# Altium PCB mla_opamp.PcbDoc (part 3 of 3)
Units mil, origin at the board's own origin, x right, y up, seen from the top; angles counter-clockwise.
Board outline 7165.35 x 3582.68 mil, 4 copper layers (Top Layer, PWD, GND, Bottom Layer), stack 23.756 mil thick; 177 components, 237 nets, 809 pads, 473 vias.
Unrouted connection lines stored in the file: 312.
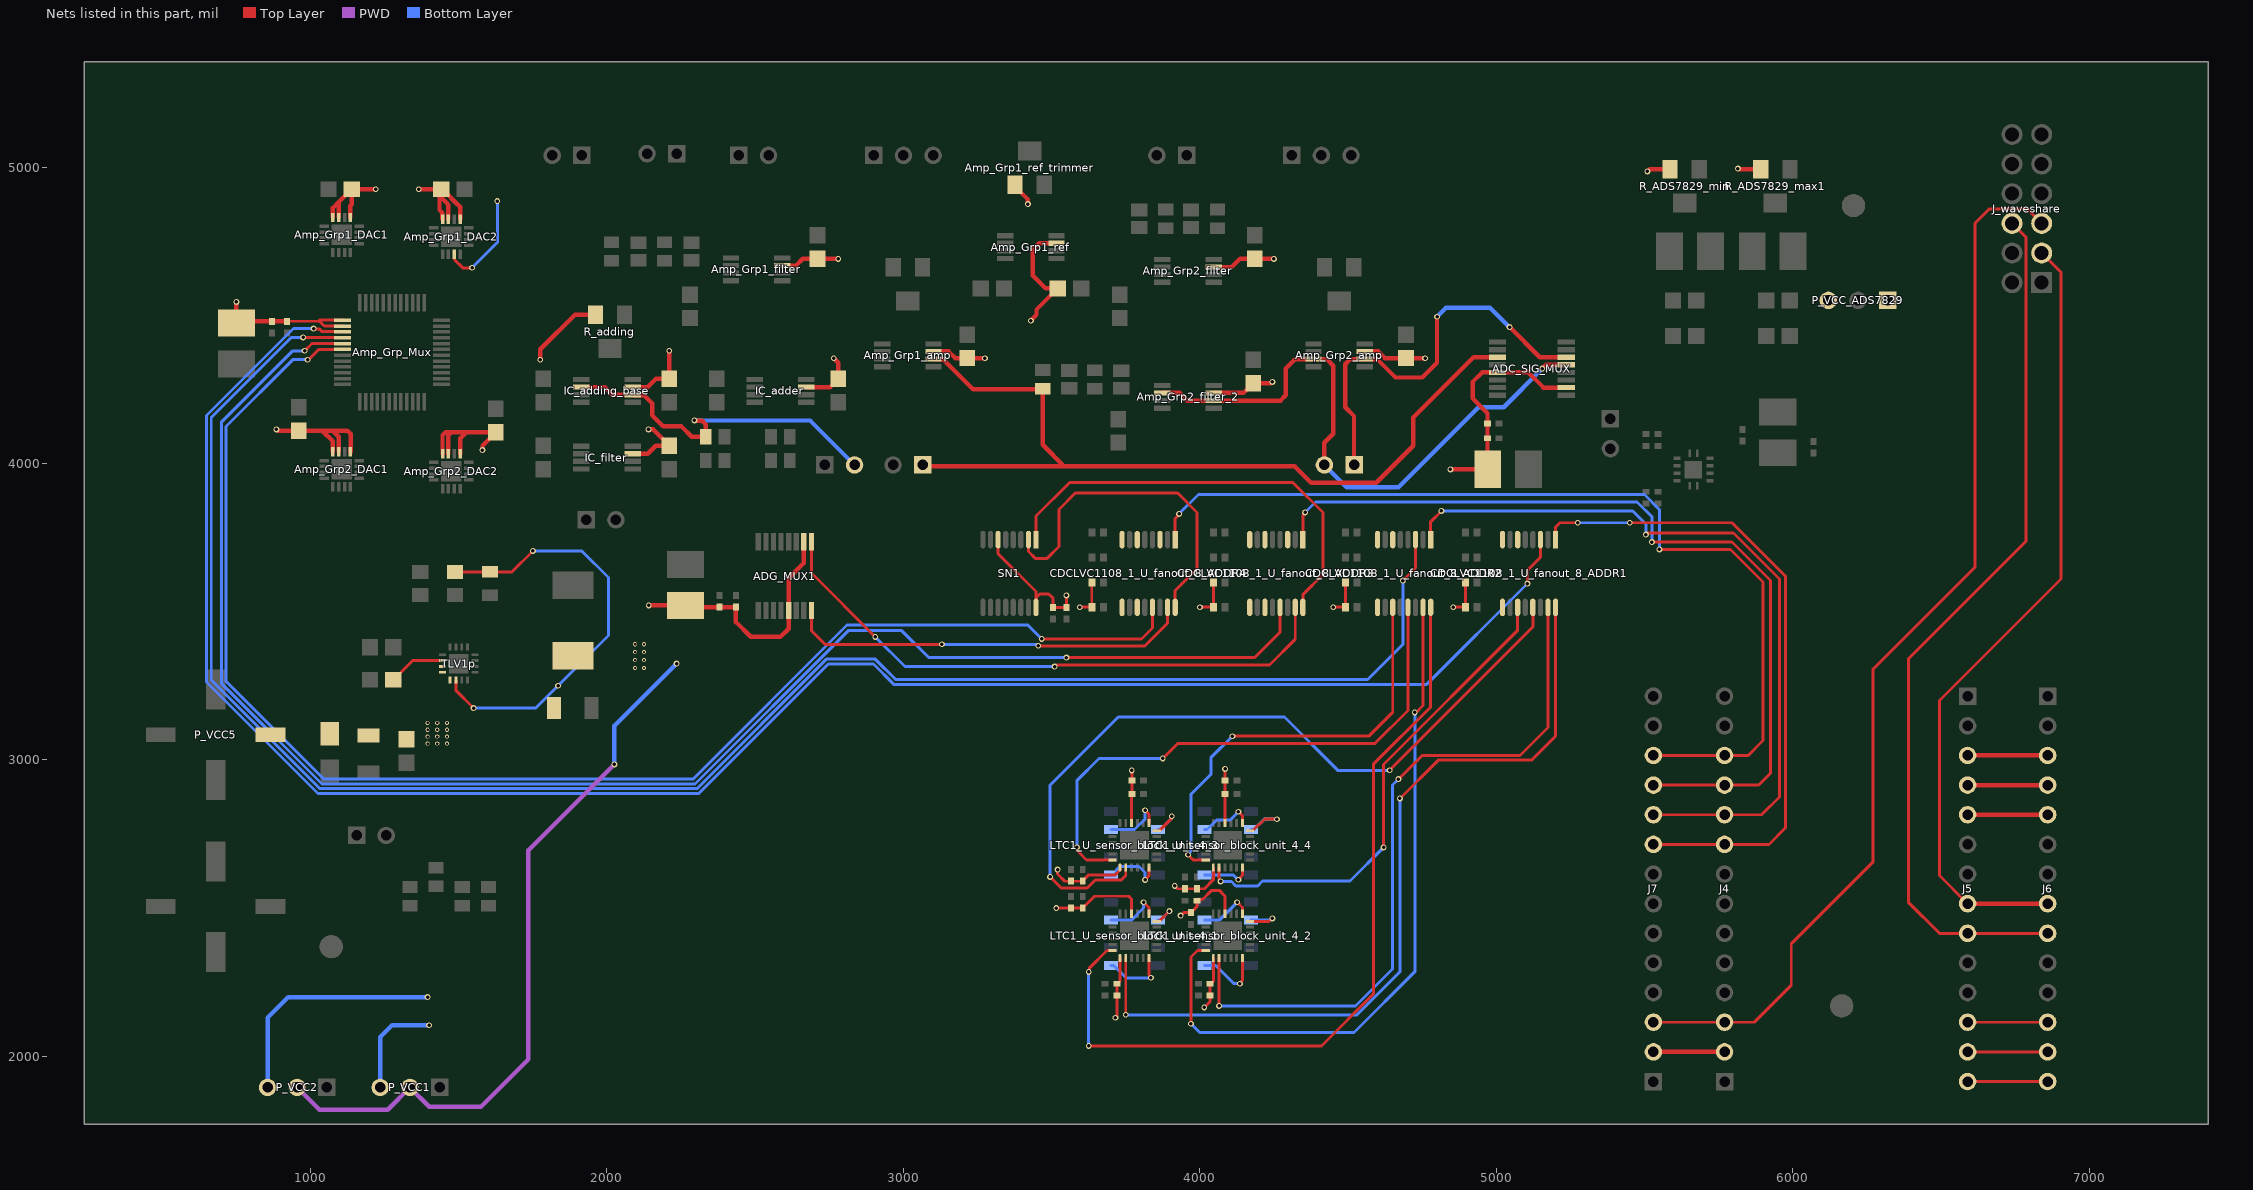
[diagram p5: the nets of this part, all layers, seen from the top]

## Via types
v1: diameter 13.78, hole 7.87, Top Layer to Bottom Layer, 282 vias
v2: diameter 19.68, hole 11.81, Top Layer to Bottom Layer, 187 vias
v3: diameter 20, hole 11, Top Layer to Bottom Layer, 4 vias

## Nets (pads, with @x,y where several pads share a name; then routed paths per layer and width w, separated by ;. In a path a pad name is that pad's centre, name@x,y a point inside that pad or via, vN(x,y) a via of type N, cw(c..) or ccw(c..) an arc to the next point about the centre after c; other vN are vias at no path point) (continued)
pt_2_U_sensor_block_unit_4_1: LTC1_U_sensor_block_unit_4_1.13 photo_transistor_2_U_sensor_block_unit_4_1.1 | length 192.7
  Top Layer w10: v2(3810.21,2520) 3810.21,2519.79 3828.66,2501.34 3828.66,2481.18 LTC1_U_sensor_block_unit_4_1.13@3828.74,2481.1
  Bottom Layer w10: photo_transistor_2_U_sensor_block_unit_4_1.1@3700.79,2459.29 3769.29,2459.29 3810.21,2500.21 v2(3810.21,2520)
pt_2_U_sensor_block_unit_4_2: LTC1_U_sensor_block_unit_4_2.13 photo_transistor_2_U_sensor_block_unit_4_2.1 | length 181.5
  Top Layer w10: v2(4125.71,2520) 4143.62,2502.09 4143.62,2481.18 LTC1_U_sensor_block_unit_4_2.13@4143.7,2481.1
  Bottom Layer w10: photo_transistor_2_U_sensor_block_unit_4_2.1@4015.75,2459.29 4065,2459.29 v2(4125.71,2520)
pt_2_U_sensor_block_unit_4_3: LTC1_U_sensor_block_unit_4_3.13 photo_transistor_2_U_sensor_block_unit_4_3.1 | length 207.9
  Top Layer w10: v2(3815,2830) 3828.74,2816.26 LTC1_U_sensor_block_unit_4_3.13@3828.74,2786.61
  Bottom Layer w10: photo_transistor_2_U_sensor_block_unit_4_3.1@3700.79,2764.8 3779.8,2764.8 3815,2800 v2(3815,2830)
pt_2_U_sensor_block_unit_4_4: LTC1_U_sensor_block_unit_4_4.13 photo_transistor_2_U_sensor_block_unit_4_4.1 | length 183.2
  Top Layer w10: v2(4130,2825) 4143.7,2811.3 LTC1_U_sensor_block_unit_4_4.13@4143.7,2786.61
  Bottom Layer w10: photo_transistor_2_U_sensor_block_unit_4_4.1@4015.75,2764.8 4024.31,2764.8 4056.89,2797.38 4102.38,2797.38 v2(4130,2825)
pt_3_U_sensor_block_unit_4_1: LTC1_U_sensor_block_unit_4_1.12 photo_transistor_3_U_sensor_block_unit_4_1.1 | length 109.5
  Top Layer w10: LTC1_U_sensor_block_unit_4_1.12@3854.33,2455.51 3863.03,2455.51 v2(3897.54,2490)
  Bottom Layer w10: photo_transistor_3_U_sensor_block_unit_4_1.1@3858.27,2459.29 3866.83,2459.29 v2(3897.54,2490)
pt_3_U_sensor_block_unit_4_2: LTC1_U_sensor_block_unit_4_2.12 photo_transistor_3_U_sensor_block_unit_4_2.1 | length 153.8
  Top Layer w10: LTC1_U_sensor_block_unit_4_2.12@4169.29,2455.51 4232.89,2455.51 4242.38,2465 v2(4245,2465)
  Bottom Layer w10: photo_transistor_3_U_sensor_block_unit_4_2.1@4173.23,2459.29 4239.29,2459.29 v2(4245,2465)
pt_3_U_sensor_block_unit_4_3: LTC1_U_sensor_block_unit_4_3.12 photo_transistor_3_U_sensor_block_unit_4_3.1 | length 144.6
  Top Layer w10: LTC1_U_sensor_block_unit_4_3.12@3854.33,2761.02 3863.03,2761.02 3903.15,2801.14 3903.15,2808.15 v2(3905,2810)
  Bottom Layer w10: photo_transistor_3_U_sensor_block_unit_4_3.1@3858.27,2764.8 3866.83,2764.8 3905,2802.97 v2(3905,2810)
pt_3_U_sensor_block_unit_4_4: LTC1_U_sensor_block_unit_4_4.12 photo_transistor_3_U_sensor_block_unit_4_4.1 | length 208.2
  Top Layer w10: LTC1_U_sensor_block_unit_4_4.12@4169.29,2761.02 4177.99,2761.02 4198.9,2781.93 4200,2781.93 4218.07,2800 v2(4260,2800)
  Bottom Layer w10: photo_transistor_3_U_sensor_block_unit_4_4.1@4173.23,2764.8 4181.79,2764.8 4216.99,2800 v2(4260,2800)
pt_4_U_sensor_block_unit_4_1: LTC1_U_sensor_block_unit_4_1.6 photo_transistor_4_U_sensor_block_unit_4_1.1 | length 220.5
  Top Layer w10: LTC1_U_sensor_block_unit_4_1.6@3828.74,2331.5 3828.74,2273.88 3835,2267.62 v2(3835,2265)
  Bottom Layer w10: photo_transistor_4_U_sensor_block_unit_4_1.1@3700.79,2306.54 3709.35,2306.54 3750.89,2265 v2(3835,2265)
pt_4_U_sensor_block_unit_4_2: LTC1_U_sensor_block_unit_4_2.6 photo_transistor_4_U_sensor_block_unit_4_2.1 | length 234.8
  Top Layer w10: v2(4135,2245) 4135,2247.62 4143.7,2256.32 LTC1_U_sensor_block_unit_4_2.6@4143.7,2331.5
  Bottom Layer w10: photo_transistor_4_U_sensor_block_unit_4_2.1@4015.75,2306.54 4053.46,2306.54 4115,2245 v2(4135,2245)
pt_4_U_sensor_block_unit_4_3: LTC1_U_sensor_block_unit_4_3.6 photo_transistor_4_U_sensor_block_unit_4_3.1 | length 211.4
  Top Layer w10: v2(3814.96,2595.19) 3828.74,2608.96 LTC1_U_sensor_block_unit_4_3.6@3828.74,2637.01
  Bottom Layer w10: photo_transistor_4_U_sensor_block_unit_4_3.1@3700.79,2612.05 3709.35,2612.05 3719.31,2622.01 3719.31,2630.57 3728.74,2640 3795,2640 3814.96,2620.04 v2(3814.96,2595.19)
pt_4_U_sensor_block_unit_4_4: LTC1_U_sensor_block_unit_4_4.6 photo_transistor_4_U_sensor_block_unit_4_4.1 | length 167.8
  Top Layer w10: v2(4130,2595.84) 4130,2597.62 4143.62,2611.24 4143.62,2636.93 LTC1_U_sensor_block_unit_4_4.6@4143.7,2637.01
  Bottom Layer w10: photo_transistor_4_U_sensor_block_unit_4_4.1@4015.75,2612.05 4112.95,2612.05 4129.16,2595.84 v2(4130,2595.84)
PT_ADDR_0_CP1: CDCLVC1108_1_U_fanout_8_ADDR1.16 LTC1_U_sensor_block_unit_4_1.2 | length 2808.2
  Top Layer w10: v2(3750,2140) LTC1_U_sensor_block_unit_4_1.2@3750,2331.5 ; v2(4675,2870) 4804,2999 5119,2999 5200,3080 CDCLVC1108_1_U_fanout_8_ADDR1.16@5200,3514.68
  Bottom Layer w10: v2(3750,2140) 4530,2140 4675,2285 v2(4675,2870)
PT_ADDR_0_CP2: CDCLVC1108_1_U_fanout_8_ADDR1.15 LTC1_U_sensor_block_unit_4_2.2 | length 2428.5
  Top Layer w10: v2(4065,2170) LTC1_U_sensor_block_unit_4_2.2@4064.96,2331.5 ; v2(4670,2935) 4750,3015 5080,3015 5174.41,3109.41 CDCLVC1108_1_U_fanout_8_ADDR1.15@5174.41,3514.68
  Bottom Layer w10: v2(4065,2170) 4525,2170 4650,2295 4650,2915 v2(4670,2935)
PT_ADDR_0_CP3: CDCLVC1108_1_U_fanout_8_ADDR1.13 LTC1_U_sensor_block_unit_4_3.2 | length 2689.4
  Top Layer w10: v2(3495,2605) 3532.18,2567.82 3620,2567.82 3647.18,2595 3735,2595 3750,2610 LTC1_U_sensor_block_unit_4_3.2@3750,2637.01 ; v2(4640,2965) 5123.23,3448.23 CDCLVC1108_1_U_fanout_8_ADDR1.13@5123.23,3514.68
  Bottom Layer w10: v2(3495,2605) 3495,2915 3724.84,3144.84 4285.16,3144.84 4465,2965 v2(4640,2965)
PT_ADDR_0_CP4: CDCLVC1108_1_U_fanout_8_ADDR1.11 LTC1_U_sensor_block_unit_4_4.2 | length 1656.8
  Top Layer w10: LTC1_U_sensor_block_unit_4_4.2@4064.96,2637.01 4064.96,2597.66 4070,2592.62 v2(4070,2590) ; v2(4620,2705) 4619.16,2705.84 4619.16,2984.16 5072.05,3437.05 CDCLVC1108_1_U_fanout_8_ADDR1.11@5072.05,3514.68
  Bottom Layer w10: v2(4070,2590) 4106.37,2590 4121.37,2575 4195,2575 4211.46,2591.46 4506.46,2591.46 v2(4620,2705)
PT_ADDR_1: CDCLVC1108_1_U_fanout_8_ADDR1.1 J4.9 J7.9 | length 2215.5
  Top Layer w10: CDCLVC1108_1_U_fanout_8_ADDR1.1@5200,3743.03 5200,3785 5215,3800 v2(5275,3800) ; v2(5450,3800) 5795,3800 5975,3620 5975,2770 5920,2715 J4.9@5770,2715 J7.9@5530,2715
  Bottom Layer w10: v2(5275,3800) v2(5450,3800)
PT_ADDR_1_CP: Amp_Grp_Mux.15 CDCLVC1108_1_U_fanout_8_ADDR1.3 | length 6611.9
  Top Layer w10: v2(1010,4455) 1011.85,4453.15 1030.69,4453.15 1039.39,4444.45 1107.6,4444.45 Amp_Grp_Mux.15@1108.15,4443.9 ; v2(5105,3595) 5105,3640 5148.82,3683.82 CDCLVC1108_1_U_fanout_8_ADDR1.3@5148.82,3743.03
  Bottom Layer w10: v2(1010,4455) 942.37,4455 649,4161.63 649,3263.12 1025.12,2887 2309.88,2887 2746.57,3323.69 2898.69,3323.69 2967.37,3255 4765,3255 v2(5105,3595)
PT_ADDR_1_CP1: CDCLVC1108_1_U_fanout_8_ADDR2.16 LTC1_U_sensor_block_unit_4_1.24 | length 2782.8
  Top Layer w10: v2(3625,2035) 4410,2035 4585,2210 4585,2985 4778.68,3178.68 CDCLVC1108_1_U_fanout_8_ADDR2.16@4778.68,3514.68 ; v2(3625,2285) 3626.85,2286.85 3626.85,2296.85 3687.09,2357.09 LTC1_U_sensor_block_unit_4_1.24@3704.72,2357.09
  Bottom Layer w10: v2(3625,2035) v2(3625,2285)
PT_ADDR_1_CP2: CDCLVC1108_1_U_fanout_8_ADDR2.15 LTC1_U_sensor_block_unit_4_2.24 | length 2379
  Top Layer w10: v2(3970,2110) 3970,2335 3992.09,2357.09 LTC1_U_sensor_block_unit_4_2.24@4019.68,2357.09 ; v2@4727.5,3157.5 4753.09,3183.09 CDCLVC1108_1_U_fanout_8_ADDR2.15@4753.09,3514.68
  Bottom Layer w10: v2(3970,2110) 4000,2080 4520,2080 4725,2285 v2(4725,3160)
PT_ADDR_1_CP3: CDCLVC1108_1_U_fanout_8_ADDR2.13 LTC1_U_sensor_block_unit_4_3.24 | length 1931
  Top Layer w10: v2(3585,2705) 3586.85,2703.15 3586.85,2693.15 3617.32,2662.68 3704.65,2662.68 LTC1_U_sensor_block_unit_4_3.24@3704.72,2662.6 ; v2(3875,3005) 3925,3055 4590,3055 4701.91,3166.91 CDCLVC1108_1_U_fanout_8_ADDR2.13@4701.91,3514.68
  Bottom Layer w10: v2(3585,2705) 3585,2930 3660,3005 v2(3875,3005)
PT_ADDR_1_CP4: CDCLVC1108_1_U_fanout_8_ADDR2.11 LTC1_U_sensor_block_unit_4_4.24 | length 1457.1
  Top Layer w10: v2(3960,2680) 3977.4,2662.6 LTC1_U_sensor_block_unit_4_4.24@4019.69,2662.6 ; v2(4110,3080) 4570,3080 4650.73,3160.73 CDCLVC1108_1_U_fanout_8_ADDR2.11@4650.73,3514.68
  Bottom Layer w10: v2(3960,2680) 3960,2682.62 3970.84,2693.46 3970.84,2884.52 4036.99,2950.68 4036.99,3006.99 v2(4110,3080)
PT_ADDR_2: CDCLVC1108_1_U_fanout_8_ADDR2.1 J4.10 J7.10 | length 2556.8
  Top Layer w10: CDCLVC1108_1_U_fanout_8_ADDR2.1@4778.68,3743.03 4778.68,3803.68 v2(4815,3840) ; v2(5505,3760) 5510,3765 5800,3765 5955,3610 5955,2875 5895,2815 J4.10@5770,2815 J7.10@5530,2815
  Bottom Layer w10: v2(4815,3840) 5460,3840 5505,3795 v2(5505,3760)
PT_ADDR_2_CP: Amp_Grp_Mux.16 CDCLVC1108_1_U_fanout_8_ADDR2.3 | length 6241.7
  Top Layer w10: v2(975,4425) 975.79,4424.21 Amp_Grp_Mux.16@1108.15,4424.21 ; v2(4685,3605) 4727.5,3647.5 CDCLVC1108_1_U_fanout_8_ADDR2.3@4727.5,3743.03
  Bottom Layer w10: v2(975,4425) 935,4425 665,4155 665,3269.75 1031.75,2903 2303.25,2903 2739.94,3339.69 2905.31,3339.69 2974,3271 4566,3271 4685,3390 v2(4685,3605)
PT_ADDR_2_CP1: CDCLVC1108_1_U_fanout_8_ADDR3.16 SN1.1 | length 1482.9
  Top Layer w10: SN1.1@3447.36,3743.03 3447.36,3822.36 3560,3935 4314.14,3935 4415,3834.14 4415,3625 4347.36,3557.36 CDCLVC1108_1_U_fanout_8_ADDR3.16@4347.36,3514.68
PT_ADDR_2_CP2: ADG_MUX1.1 CDCLVC1108_1_U_fanout_8_ADDR3.15 | length 2014
  Top Layer w10: ADG_MUX1.1@2689.57,3735.67 2689.57,3630.43 v2(2905,3415) ; v2(3510,3315) 3515,3320 4235,3320 4321.77,3406.77 CDCLVC1108_1_U_fanout_8_ADDR3.15@4321.77,3514.68
  Bottom Layer w10: v2(2905,3415) 3005,3315 v2(3510,3315)
PT_ADDR_3: CDCLVC1108_1_U_fanout_8_ADDR3.1 J4.11 J7.11 | length 2901.5
  Top Layer w10: CDCLVC1108_1_U_fanout_8_ADDR3.1@4347.36,3743.03 4347.36,3824.74 4355,3832.38 v2(4355,3835) ; v2(5525,3735) 5795,3735 5925,3605 5925,2955 5885,2915 J4.11@5770,2915 J7.11@5530,2915
  Bottom Layer w10: v2(4355,3835) 4390,3870 5475,3870 5525.84,3819.16 5525.84,3735.84 v2(5525,3735)
PT_ADDR_3_CP: Amp_Grp_Mux.17 CDCLVC1108_1_U_fanout_8_ADDR3.13 | length 5483.2
  Top Layer w10: v2(980,4380) 1004.53,4404.53 Amp_Grp_Mux.17@1108.15,4404.53 ; v2(3550,3345) 4185,3345 4270.59,3430.59 CDCLVC1108_1_U_fanout_8_ADDR3.13@4270.59,3514.68
  Bottom Layer w10: v2(980,4380) 940,4380 699,4139 699,3513.37 699,3258.37 1038.37,2919 2296.63,2919 2813.47,3435.84 2994.16,3435.84 3085,3345 v2(3550,3345)
PT_ADDR_3_CP1: CDCLVC1108_1_U_fanout_8_ADDR4.16 SN1.2 | length 1159.6
  Top Layer w10: SN1.2@3421.77,3743.03 3421.77,3703.23 3445,3680 3485,3680 3525,3720 3525,3845 3580,3900 3925,3900 3990,3835 3990,3645 3916.77,3571.77 CDCLVC1108_1_U_fanout_8_ADDR4.16@3916.77,3514.68
PT_ADDR_3_CP2: ADG_MUX1.16 CDCLVC1108_1_U_fanout_8_ADDR4.15 | length 1376.5
  Top Layer w10: ADG_MUX1.16@2689.57,3504.33 2689.57,3435.43 2735,3390 v2(3130,3390) ; v2(3455,3385) 3815,3385 3891.18,3461.18 CDCLVC1108_1_U_fanout_8_ADDR4.15@3891.18,3514.68
  Bottom Layer w10: v2(3130,3390) 3447.38,3390 3452.38,3385 v2(3455,3385)
PT_ADDR_4: CDCLVC1108_1_U_fanout_8_ADDR4.1 J4.12 J7.12 | length 3216.4
  Top Layer w10: CDCLVC1108_1_U_fanout_8_ADDR4.1@3916.77,3743.03 3916.77,3814.15 3930,3827.38 v2(3930,3830) ; J7.12@5530,3015 J4.12@5770,3015 5850,3015 5900,3065 5900,3600 5790,3710 v2(5550,3710)
  Bottom Layer w10: v2(3930,3830) 3995,3895 5500,3895 5550,3845 v2(5550,3710)
PT_ADDR_4_CP: Amp_Grp_Mux.18 CDCLVC1108_1_U_fanout_8_ADDR4.13 | length 4942.4
  Top Layer w10: v2(990,4350) 992.62,4350 1027.46,4384.84 Amp_Grp_Mux.18@1108.15,4384.84 ; v2(3466.49,3407.97) 3802.97,3407.97 3840,3445 CDCLVC1108_1_U_fanout_8_ADDR4.13@3840,3514.68
  Bottom Layer w10: v2(990,4350) 940,4350 715,4125 715,3265 1045,2935 2290,2935 2810,3455 3419.46,3455 v2(3466.49,3407.97)
SAM_PORTS.PA02: J4.2 J7.2 | length 240
  Top Layer w15: J7.2@5530,2015 J4.2@5770,2015
sensor_grp1_amp_o: ADC_SIG_MUX.11 Amp_Grp1_amp.6 Amp_Grp1_amp_P_o_of.1 Amp_Grp2_filter2_R1.1 | length 2896.2
  Top Layer w15: Amp_Grp1_amp_P_o_of.1@3065,3995 3070,3990 3542.99,3990 ; Amp_Grp1_amp.6@3101.61,4352.2 3102.97,4350.85 3134.15,4350.85 3235,4250 Amp_Grp2_filter2_R1.1@3467.99,4250 ; Amp_Grp2_filter2_R1.1@3470,4252.01 3470,4062.99 3542.99,3990 ; ADC_SIG_MUX.11@5004.33,4358.39 4923.39,4358.39 4720,4155 4720,4060 4595,3935 4375,3935 4320,3990 3542.99,3990
sensor_grp1_amp_of: ADC_SIG_MUX.5 Amp_Grp2_amp.3 Amp_Grp2_amp_o_of.2 Amp_Grp2_filter_2.2 Amp_Grp2_filter_2.6 | length 2072.3
  Top Layer w15: Amp_Grp2_filter_2.2@3873.39,4237.8 3932.2,4237.8 3957.8,4212.2 Amp_Grp2_filter_2.6@4046.61,4212.2 4272.2,4212.2 4290,4230 4290,4320 4322.2,4352.2 Amp_Grp2_amp.3@4383.39,4352.2 4427.8,4352.2 4450,4330 4450,4100 4420,4070 Amp_Grp2_amp_o_of.2@4420,3995 ; v2(5155,4320) 5167.8,4332.8 ADC_SIG_MUX.5@5235.67,4332.8
  Bottom Layer w15: Amp_Grp2_amp_o_of.2@4420,3995 4495,3920 4670,3920 4940,4190 5025,4190 v2(5155,4320)
sensor_grp2_amp_o: ADC_SIG_MUX.6 Amp_Grp2_amp.6 Amp_Grp2_amp_o_of.1 | length 1387.6
  Top Layer w15: Amp_Grp2_amp_o_of.1@4520,3995 4520,4160 4490,4190 4490,4335 4506.56,4351.56 4557.26,4351.56 4557.97,4350.85 4599.15,4350.85 4660,4290 4750,4290 4800,4340 v2(4800,4495) ; v2(5045,4460) 5146.61,4358.39 ADC_SIG_MUX.6@5235.67,4358.39
  Bottom Layer w15: v2(4800,4495) 4830,4525 4978.73,4525 5043.73,4460 v2(5045,4460)
SIG_4_U_fanout_8_ADDR3: CDCLVC1108_1_U_fanout_8_ADDR3.11
SIG_4_U_fanout_8_ADDR4: CDCLVC1108_1_U_fanout_8_ADDR4.11
SIG_5_U_fanout_8_ADDR3: CDCLVC1108_1_U_fanout_8_ADDR3.3
SIG_5_U_fanout_8_ADDR4: CDCLVC1108_1_U_fanout_8_ADDR4.3
SIG_6_U_fanout_8_ADDR1: CDCLVC1108_1_U_fanout_8_ADDR1.6
SIG_6_U_fanout_8_ADDR2: CDCLVC1108_1_U_fanout_8_ADDR2.6
SIG_6_U_fanout_8_ADDR3: CDCLVC1108_1_U_fanout_8_ADDR3.6
SIG_6_U_fanout_8_ADDR4: CDCLVC1108_1_U_fanout_8_ADDR4.6
SIG_7_U_fanout_8_ADDR1: CDCLVC1108_1_U_fanout_8_ADDR1.8
SIG_7_U_fanout_8_ADDR2: CDCLVC1108_1_U_fanout_8_ADDR2.8
SIG_7_U_fanout_8_ADDR3: CDCLVC1108_1_U_fanout_8_ADDR3.8
SIG_7_U_fanout_8_ADDR4: CDCLVC1108_1_U_fanout_8_ADDR4.8
SIG_8_U_fanout_8_ADDR1: CDCLVC1108_1_U_fanout_8_ADDR1.9
SIG_8_U_fanout_8_ADDR2: CDCLVC1108_1_U_fanout_8_ADDR2.9
SIG_8_U_fanout_8_ADDR3: CDCLVC1108_1_U_fanout_8_ADDR3.9
SIG_8_U_fanout_8_ADDR4: CDCLVC1108_1_U_fanout_8_ADDR4.9
signal_adding_base: adding_base.2 Adding_r1.1 IC_adding_base.2 IC_adding_base.6 | length 1200.8
  Top Layer w15: IC_adding_base.2@1913.39,4257.8 1992.2,4257.8 2017.8,4232.2 IC_adding_base.6@2086.61,4232.2 2087.97,4230.85 2124.15,4230.85 2152.08,4202.92 2152.08,4162.92 2190,4125 2251.21,4125 2286.21,4090 Adding_r1.1@2333.5,4090 2333.5,4131.5 2320.9,4144.1 2295.9,4144.1 v2(2295,4145)
  Bottom Layer w15: v2(2295,4145) 2685,4145 adding_base.2@2835,3995
SPI_CLK: J5.4 J6.4 | length 270
  Top Layer w15: J5.4@6590,2915 J6.4@6860,2915
SPI_CLK2: J5.8 J6.8 J_waveshare.3 | length 2701.1
  Top Layer w10: J5.8@6590,2515 6495,2610 6495,3200 6905,3610 6905,4645 J_waveshare.3@6840,4710
  Top Layer w15: J5.8@6590,2515 J6.8@6860,2515
SPI_MISO: J5.5 J6.5 | length 270
  Top Layer w15: J5.5@6590,2815 J6.5@6860,2815
SPI_MISO2: J5.9 J6.9 J_waveshare.6 | length 2986.9
  Top Layer w10: J_waveshare.6@6740,4810 6786.43,4763.57 6786.43,3736.43 6390,3340 6390,2520 6495,2415 J5.9@6590,2415 J6.9@6860,2415
SPI_MOSI: J5.3 J6.3 | length 270
  Top Layer w15: J5.3@6590,3015 J6.3@6860,3015
SPI_MOSI2: J4.3 J7.3 J_waveshare.5 | length 3609.1
  Top Layer w10: J7.3@5530,2115 J4.3@5770,2115 5870,2115 5995,2240 5995,2380 6270,2655 6270,3305 6615,3650 6615,4810 6663.93,4858.93 6791.07,4858.93 J_waveshare.5@6840,4810
VCC3.3: C3p.2 C4_U_fanout_8_ADDR1.2 C4_U_fanout_8_ADDR2.2 C4_U_fanout_8_ADDR3.2 C4_U_fanout_8_ADDR4.2 C_SN2.1 C_SN_1.1 FB1_U_fanout_8_ADDR1.1 FB1_U_fanout_8_ADDR2.1 FB1_U_fanout_8_ADDR3.1 FB1_U_fanout_8_ADDR4.1 L1p.2 P_VCC1.2 P_VCC2.2 P_VCC_ADS7829.1 R1p.1 R2p.1 SN1.6 SN1.16 TLV1p.14 | length 4947.6
  Top Layer w10: R2p.1@1487.5,3634.37 R1p.1@1605,3634.37 1679.37,3634.37 v2(1750,3705) ; TLV1p.14@1490.16,3269.88 1490.16,3234.84 v2(1550,3175) ; C3p.2@1822.01,3175 C3p.2@1822.01,3188.78 ; SN1.6@3319.41,3743.03 3319.41,3695.59 3447.36,3567.64 SN1.16@3447.36,3514.68 3448.84,3516.16 3448.84,3548.84 3460,3560 3490,3560 3505,3545 C_SN2.1@3505,3514.68 C_SN_1.1@3550,3514.68 v2(3550,3555) ; v2(3595,3515) C4_U_fanout_8_ADDR4.2@3635.31,3515 FB1_U_fanout_8_ADDR4.1@3635.32,3598.89 ; v2(4000,3515) C4_U_fanout_8_ADDR3.2@4045.31,3515 FB1_U_fanout_8_ADDR3.1@4045.32,3598.89 ; v2(4450,3515) C4_U_fanout_8_ADDR2.2@4490.63,3515 FB1_U_fanout_8_ADDR2.1@4490.63,3598.89 ; v2(4855,3515) C4_U_fanout_8_ADDR1.2@4895.63,3515 FB1_U_fanout_8_ADDR1.1@4895.63,3598.89
  PWD w15: P_VCC2.2@955,1895 1030,1820 1260,1820 P_VCC1.2@1335,1895 1400,1830 1575,1830 1735,1990 1735,2695 v2(2025,2985)
  Bottom Layer w10: v2(1550,3175) 1760,3175 v2(1835,3250) 2005,3420 2005,3615 1915,3705 v2(1750,3705)
  Bottom Layer w15: v2(2025,2985) 2025,3115 v2(2235,3325)
  other v1: 2095,3310 2125,3310 2095,3336.67 2125,3336.67 2095,3363.33 2125,3363.33 2095,3390 2125,3390
VCC3.3_ARDUINO: J5.12 J6.12 | length 270
  Top Layer w10: J5.12@6590,2115 J6.12@6860,2115
VCC5: ADC_SIG_MUX.2 ADC_SIG_MUX.13 ADC_SIG_MUX_C1.1 ADC_SIG_MUX_C2.1 ADC_SIG_MUX_C3.1 ADG_MUX1.2 ADG_MUX1.13 Amp_Grp1_amp.7 Amp_Grp1_amp_C1.2 Amp_Grp1_DAC1.13 Amp_Grp1_DAC1.15 Amp_Grp1_DAC1.16 Amp_Grp1_DAC1_C1.1 Amp_Grp1_DAC2.7 Amp_Grp1_DAC2.13 Amp_Grp1_DAC2.15 Amp_Grp1_DAC2.16 Amp_Grp1_DAC2_C1.1 Amp_Grp1_filter.7 Amp_Grp1_filter_C1.2 Amp_Grp1_ref.7 Amp_Grp1_ref_C1.2 Amp_Grp1_ref_trimmer.1 Amp_Grp2_amp.7 Amp_Grp2_amp_C1.2 Amp_Grp2_DAC1.13 Amp_Grp2_DAC1.15 Amp_Grp2_DAC1.16 Amp_Grp2_DAC1_C1.1 Amp_Grp2_DAC2.13 Amp_Grp2_DAC2.15 Amp_Grp2_DAC2.16 Amp_Grp2_DAC2_C2.1 Amp_Grp2_filter2_C1.2 Amp_Grp2_filter.7 Amp_Grp2_filter_2.7 Amp_Grp2_filter_C1.2 Amp_Grp_Mux.13 Amp_Grp_Mux.14 Amp_Grp_Mux_C1.1 Amp_Grp_Mux_C2.1 Amp_Grp_Mux_C3.1 C1p.1 C2p.2 C4p.2 C_ADG1.1 C_ADG2.1 C_ADG3.1 C_LTC1_1_U_sensor_block_unit_4_1.1 C_LTC1_1_U_sensor_block_unit_4_2.1 C_LTC1_1_U_sensor_block_unit_4_3.1 C_LTC1_1_U_sensor_block_unit_4_4.1 C_LTC2_1_U_sensor_block_unit_4_1.1 C_LTC2_1_U_sensor_block_unit_4_2.1 C_LTC2_1_U_sensor_block_unit_4_3.1 C_LTC2_1_U_sensor_block_unit_4_4.1 C_LTC3_1_U_sensor_block_unit_4_1.1 C_LTC3_1_U_sensor_block_unit_4_2.1 C_LTC3_1_U_sensor_block_unit_4_3.1 C_LTC3_1_U_sensor_block_unit_4_4.1 C_LTC4_1_U_sensor_block_unit_4_1.1 C_LTC4_1_U_sensor_block_unit_4_2.1 C_LTC4_1_U_sensor_block_unit_4_3.1 C_LTC4_1_U_sensor_block_unit_4_4.1 IC_adder.7 IC_adder_C1.2 IC_adding_base.7 IC_adding_base_C1.2 IC_filter.7 IC_filter_C1.2 LTC1_U_sensor_block_unit_4_1.1 LTC1_U_sensor_block_unit_4_1.16 LTC1_U_sensor_block_unit_4_2.1 LTC1_U_sensor_block_unit_4_2.16 LTC1_U_sensor_block_unit_4_3.1 LTC1_U_sensor_block_unit_4_3.16 LTC1_U_sensor_block_unit_4_4.1 LTC1_U_sensor_block_unit_4_4.16 P_C1p.2 P_VCC1.3 P_VCC2.3 P_VCC5.1 P_VCC_ADS7829.3 R_adding.CW R_ADS7829_max1.CW R_ADS7829_min.CW TLV1p.10 TLV1p.11 TLV1p.12 TLV1p.13 | length 10022.9
  Top Layer w10: Amp_Grp_Mux_C3.1@920,4479.69 1026.42,4479.69 1030,4483.27 ; Amp_Grp_Mux.14@1108.15,4463.58 1046.42,4463.58 1030,4480 1030,4483.27 ; Amp_Grp_Mux.13@1108.15,4483.27 1030,4483.27 ; C4p.2@1279.37,3270 1280.35,3270 1301.93,3291.57 1301.93,3292.56 1344.21,3334.84 TLV1p.10@1444.88,3334.84 ; Amp_Grp1_DAC2.7@1484.84,4705.94 1485.75,4705.04 1485.75,4687.51 1513.26,4660 v2(1545,4660) ; v2(3515.32,2500.32) C_LTC4_1_U_sensor_block_unit_4_1.1@3565,2500.32 C_LTC3_1_U_sensor_block_unit_4_1.1@3605,2500.32 3605,2502.28 3609.84,2507.13 3611.81,2507.13 3644.68,2540 3760,2540 3769.69,2530.31 LTC1_U_sensor_block_unit_4_1.16@3769.69,2481.1 ; v2(3520,2630) 3520,2615 3544.37,2590.63 C_LTC1_1_U_sensor_block_unit_4_3.1@3565,2590.63 C_LTC2_1_U_sensor_block_unit_4_3.1@3605,2590.63 3605,2592.6 3623.4,2611 3713.01,2611 3730.32,2628.31 LTC1_U_sensor_block_unit_4_3.1@3730.32,2637.01 ; v2(3715,2130) 3719.68,2134.68 C_LTC1_1_U_sensor_block_unit_4_1.1@3719.68,2205 C_LTC2_1_U_sensor_block_unit_4_1.1@3719.68,2245 3721.65,2245 3730.32,2253.66 LTC1_U_sensor_block_unit_4_1.1@3730.32,2331.5 ; LTC1_U_sensor_block_unit_4_3.16@3769.69,2786.61 3769.76,2786.69 3769.76,2884.45 C_LTC3_1_U_sensor_block_unit_4_3.1@3770.32,2885 C_LTC4_1_U_sensor_block_unit_4_3.1@3770.32,2930 v2(3770.32,2964.68) ; v2(3915,2575) 3924.68,2565.32 C_LTC1_1_U_sensor_block_unit_4_4.1@3950,2565.32 C_LTC2_1_U_sensor_block_unit_4_4.1@3990,2565.32 4015.32,2565.32 4045.28,2595.28 LTC1_U_sensor_block_unit_4_4.1@4045.28,2637.01 ; v2(3935,2475) 3935.65,2475 3945.33,2484.68 C_LTC3_1_U_sensor_block_unit_4_2.1@3970,2484.68 3970,2486.65 3974.84,2491.5 3976.81,2491.5 3989.68,2504.37 C_LTC4_1_U_sensor_block_unit_4_2.1@3989.68,2525 3993.46,2528.78 4008.78,2528.78 4040,2560 4065,2560 4084.65,2540.35 LTC1_U_sensor_block_unit_4_2.16@4084.65,2481.1 ; v2(4015,2165) 4034.68,2184.68 C_LTC1_1_U_sensor_block_unit_4_2.1@4034.68,2205 C_LTC2_1_U_sensor_block_unit_4_2.1@4034.68,2245 4036.65,2245 4045.28,2253.62 LTC1_U_sensor_block_unit_4_2.1@4045.28,2331.5 ; LTC1_U_sensor_block_unit_4_4.16@4084.65,2786.61 4084.72,2786.69 4084.72,2884.41 C_LTC3_1_U_sensor_block_unit_4_4.1@4085.32,2885 C_LTC4_1_U_sensor_block_unit_4_4.1@4085.32,2930 v2(4085.32,2969.68)
  Top Layer w15: v2(750,4545) Amp_Grp_Mux_C1.1@750,4473.9 755.79,4479.69 Amp_Grp_Mux_C2.1@870,4479.69 Amp_Grp_Mux_C3.1@920,4479.69 ; v2(885,4115) 889.37,4110.63 Amp_Grp2_DAC1_C1.1@960,4110.63 1039.37,4110.63 ; C1p.1@1057.01,3080 C1p.1@1065,3087.99 ; Amp_Grp2_DAC1.16@1075.47,4039.06 1075.47,4074.53 1039.37,4110.63 ; Amp_Grp1_DAC1.16@1075.47,4829.9 1075.47,4862.09 1095.16,4881.77 ; Amp_Grp2_DAC1.15@1095.16,4039.06 1095.16,4089.84 1074.37,4110.63 ; Amp_Grp1_DAC1.15@1095.16,4829.9 1095.16,4881.77 ; Amp_Grp2_DAC1.13@1134.53,4039.06 1135,4039.53 1135,4100 1124.37,4110.63 1074.37,4110.63 ; Amp_Grp1_DAC1.13@1134.53,4829.9 1134.53,4869.53 1139.37,4874.37 Amp_Grp1_DAC1_C1.1@1139.37,4925 ; P_C1p.2@1190.25,3087.99 P_C1p.2@1195.25,3082.99 ; v2(1220,4925) Amp_Grp1_DAC1_C1.1@1139.37,4925 ; C2p.2@1309.88,3082.99 C2p.2@1323.5,3069.37 ; v2(1365,4925) Amp_Grp1_DAC2_C1.1@1440.63,4925 1459.7,4905.93 1464.07,4905.93 1485,4885 1504.53,4865.47 Amp_Grp1_DAC2.13@1504.53,4824.06 ; Amp_Grp2_DAC2.16@1445.47,4033.21 1445,4033.68 1445,4095 1455.63,4105.63 1475.63,4105.63 ; Amp_Grp1_DAC2.16@1445.47,4824.06 1443.88,4825.65 1443.88,4846.12 1435,4855 1435,4902.79 1465.16,4872.63 Amp_Grp1_DAC2.15@1465.16,4824.06 ; Amp_Grp2_DAC2.15@1465.16,4033.21 1465.16,4095.16 1475.63,4105.63 ; Amp_Grp2_DAC2.13@1504.53,4033.21 1504.53,4084.53 1525.63,4105.63 ; v2(1580,4045) 1580,4059.65 1625,4104.65 Amp_Grp2_DAC2_C2.1@1625,4105.63 1525.63,4105.63 ; v2(1775,4350) 1775,4385 1892.09,4502.09 R_adding.CW@1960.79,4502.09 ; IC_filter.7@2086.61,4032.8 2137.8,4032.8 2164.37,4059.37 IC_filter_C1.2@2210,4059.37 2210,4060.35 2155.35,4115 v2(2140,4115) ; IC_adding_base.7@2086.61,4257.8 2137.8,4257.8 2165.35,4285.35 IC_adding_base_C1.2@2210,4285.35 v2(2210,4380) ; v2(2141.1,3521.1) C_ADG3.1@2265,3521.1 2270.79,3515.32 C_ADG2.1@2380,3515.32 2380.16,3515.16 2434.84,3515.16 C_ADG1.1@2435,3515 2435,3465 2485,3415 2585,3415 2612.8,3442.8 ADG_MUX1.13@2612.8,3504.33 2612.8,3612.8 2663.98,3663.98 ADG_MUX1.2@2663.98,3735.67 ; Amp_Grp1_filter.7@2591.61,4667.8 2637.8,4667.8 2660.63,4690.63 Amp_Grp1_filter_C1.2@2710,4690.63 2779.37,4690.63 v2(2780,4690) ; IC_adder.7@2671.61,4257.8 2753.43,4257.8 2780,4284.37 IC_adder_C1.2@2780,4285.35 2780,4340 v2(2765,4355) ; Amp_Grp1_amp.7@3101.61,4377.8 3152.2,4377.8 3174.37,4355.63 Amp_Grp1_amp_C1.2@3215,4355.63 3274.37,4355.63 v2(3275,4355) ; Amp_Grp1_ref_trimmer.1@3376.57,4940 3376.57,4934.09 3420,4890.67 v2(3420,4875) ; v2(3430,4481.66) 3430,4482.93 3448.82,4501.75 3448.82,4519.18 3519.65,4590 Amp_Grp1_ref_C1.2@3520.63,4590 3519.99,4590.64 3479.36,4590.64 3436,4634 3436,4721 3457.8,4742.8 Amp_Grp1_ref.7@3516.61,4742.8 ; Amp_Grp2_filter_2.7@4046.61,4237.8 4147.17,4237.8 4159.94,4250.57 4160.93,4250.57 4180,4269.65 Amp_Grp2_filter2_C1.2@4180,4270.63 4240.63,4270.63 v2(4245,4275) ; Amp_Grp2_filter.7@4046.61,4662.8 4107.8,4662.8 4135.63,4690.63 Amp_Grp2_filter_C1.2@4185,4690.63 4249.37,4690.63 v2(4250,4690) ; Amp_Grp2_amp.7@4556.61,4377.8 4602.2,4377.8 4624.37,4355.63 Amp_Grp2_amp_C1.2@4695,4355.63 4695.63,4355 v2(4760,4355) ; v2(4845,3980) ADC_SIG_MUX_C3.1@4971.1,3980 4970.31,3980.79 ADC_SIG_MUX_C2.1@4970.31,4085 ADC_SIG_MUX_C1.1@4970.31,4135 4970.31,4169.69 4920,4220 4920,4275 4952.2,4307.2 ADC_SIG_MUX.13@5004.33,4307.2 5107.8,4307.2 5158.98,4256.02 ADC_SIG_MUX.2@5235.67,4256.02 ; v2(5510,4985) 5517.91,4992.91 R_ADS7829_min.CW@5586.47,4992.91 ; v2(5815,4995) 5817.09,4992.91 R_ADS7829_max1.CW@5891.83,4992.91 ; 1039.37,4110.63 1074.37,4110.63 ; 1095.16,4881.77 1138.39,4925 Amp_Grp1_DAC1_C1.1@1139.37,4925 ; 1475.63,4105.63 1525.63,4105.63
  Bottom Layer w10: v2(1545,4660) 1630,4745 v2(1630,4885)
  Bottom Layer w15: P_VCC2.3@855,1895 855,2130 925,2200 v2(1395,2200) ; P_VCC1.3@1235,1895 1235,2065 1275,2105 v2(1400,2105)
  other v1: 1395,3055 1427.5,3055 1460,3055 1395,3078.33 1427.5,3078.33 1460,3078.33 1395,3101.67 1427.5,3101.67 1460,3101.67 1395,3125 1427.5,3125 1460,3125
VCC5_ARDUINO: J5.14 J6.14 | length 270
  Top Layer w10: J5.14@6590,1915 J6.14@6860,1915
VIN_ARDUINO: J5.13 J6.13 | length 270
  Top Layer w10: J5.13@6590,2015 J6.13@6860,2015
pads on no net: P_PT.3 P_VCC5.3

## Polygon pours and split planes (outlines as drawn)
GND on Top Layer "GND_L01_P043" (solid, remove dead copper, pour order 43): 235,1770 7400,1770 7400,5355 235,5355
-VCC_PT on Top Layer "-VCC_PT_L01_P023" (solid, remove dead copper, pour order 23): 820,2530 1365,2530 1365,2480 815,2480
VCC5 on Top Layer "VCC5_L01_P008" (solid, remove dead copper, pour order 8): 1245,3130 1245,3300 1310,3300 1310,3135 1305,3130
NetC_POW1_1 on Top Layer "NETC_POW1_1_L01_P024" (solid, remove dead copper, pour order 24): 1305,2595 1540,2595 1540,2545 1305,2545
VCC5 on Top Layer "VCC5_L01_P009" (solid, remove dead copper, pour order 9): 1405,3320 1390,3305 1390,3040 1475,3040 1475,3285 1455,3305 1455,3320
VCC5 on Top Layer "VCC5_L01_P007" (solid, remove dead copper, pour order 7): 815,3040 1475,3040 1475,3140 815,3140
NetL1p_1 on Top Layer "NETL1P_1_L01_P005" (solid, remove dead copper, pour order 5): 1815,3635 1955,3635 1955,3545 1850,3545 1765,3460 1765,3375 1675,3285 1545,3285 1545,3340 1610,3340 1685,3415 1685,3505
VCC3.3 on Top Layer "VCC3.3_L01_P004" (solid, remove dead copper, pour order 4): 2145,3405 2145,3285 1885,3285 1885,3130 1880,3135 1790,3135 1790,3405
-Vbias on Top Layer "-VBIAS_L01_P000" (solid, remove dead copper, pour order 0): 1575,2530 1575,2440 1875,2440 1875,2530
GND on PWD "GND_L02_P040" (solid, remove dead copper, pour order 40): 235,1770 7400,1770 7400,5355 235,5355
VCC5 on PWD "VCC5_L02_P014" (solid, remove dead copper, pour order 14): 3345,4420 3375,4450 3375,4920 3485,4920 3485,4420 5650,4420 5650,4165 2215,4165 2215,3455 2080,3455 2080,4420
VCC3.3 on PWD "VCC3.3_L02_P006" (solid, remove dead copper, pour order 6): 6425,4605 6280,4605 6280,4500 6285,4495 6425,4495 6425,3760 6070,3405 2055,3405 2055,3285 6165,3285 6530,3650 6530,4605
VCC5 on PWD "VCC5_L02_P011" (solid, remove dead copper, pour order 11): 1370,3135 3055,3135 3190,3000 4100,3000 4100,2705 3965,2570 3965,2335 4050,2250 4050,2145 3940,2145 3875,2080 3690,2080 3690,2155 3840,2155 3880,2195 3970,2195 3970,2230 3895,2305 3895,2615 4015,2735 4015,2925 3120,2925 3005,3040 1370,3040
VCC5 on PWD "VCC5_L02_P012" (solid, remove dead copper, pour order 12): 6180,4090 6180,4960 6390,4960 6390,5035 5460,5035 5460,4230 5650,4230 5650,4890 6075,4890 6075,4090
VCC5 on PWD "VCC5_L02_P020" (solid, remove dead copper, pour order 20): 1375,3155 1375,2000 1565,2000 1565,2110 1480,2110 1480,3155
VCC3.3 on PWD "VCC3.3_L02_P022" (solid, remove dead copper, pour order 22): 3050,3405 3225,3580 5270,3580 5490,3360 5490,3295 3115,3295 3045,3365
VCC5 on PWD "VCC5_L02_P019" (solid, remove dead copper, pour order 19): 3470,2450 3560,2450 3560,2975 3470,2975
VCC5 on PWD "VCC5_L02_P018" (solid, remove dead copper, pour order 18): 2752.64,4395.96 2822.73,4395.96 2822.73,4722.88 2753.21,4722.88
VCC5 on PWD "VCC5_L02_P017" (solid, remove dead copper, pour order 17): 4214.9,4400 4285,4400 4285,4726.93 4215.48,4726.93
VCC5 on PWD "VCC5_L02_P016" (solid, remove dead copper, pour order 16): 4800,3935 4870,3935 4870,4206.93 4800.48,4206.93
VCC5 on PWD "VCC5_L02_P015" (solid, remove dead copper, pour order 15): 2155,4420 1370,4420 1370,4000 1686.77,4000 1690,4003.23 1690,4170 2155,4170
-Vbias on PWD "-VBIAS_L02_P003" (solid, remove dead copper, pour order 3): 3590,2325 3320,2325 3125,2130 3195,2060 3200,2060 3380,2240 3670,2240 3670,2915 3590,2915
VCC5 on PWD "VCC5_L02_P010" (solid, remove dead copper, pour order 10): 1370,3040 1370,4000 660,4000 655,4005 655,5010 1705,5010 1705,4835 860,4835 860,4170 1690,4170 1690,3040
-Vbias on PWD "-VBIAS_L02_P002" (solid, remove dead copper, pour order 2): 4260,1905 4260,2900 4335,2900 4335,1905
-Vbias on PWD "-VBIAS_L02_P001" (solid, remove dead copper, pour order 1): 1800,2530 1800,2440 2805,2440 3340,1905 4335,1905 4335,2000 3425,2000 2895,2530
GND on GND "GND_L03_P041" (solid, remove dead copper, pour order 41): 235,1770 7400,1770 7400,5355 235,5355
GND on Bottom Layer "GND_L04_P042" (solid, remove dead copper, pour order 42): 235,1770 7400,1770 7400,5355 235,5355

## Keep-outs
Keep-Out Layer:
  circle w10: c6205,4870 r78.74
  circle w10: c6205,4870 r78.74
  circle w10: c6165,2170 r78.74
  circle w10: c1070,2370 r78.74
  circle w10: c6165,2170 r78.74
  circle w10: c1070,2370 r78.74
  circle w10: c470,5050 r62.99
  circle w10: c7090,5050 r62.99
  circle w10: c470,1929.13 r62.99
  circle w10: c7090,1906.26 r62.99
  circle w10: c2795.28,3208.66 r59.06
  circle w10: c5078.74,3208.66 r59.06
  circle w10: c5078.74,1909.45 r59.06
  circle w10: c2795.28,1909.45 r59.06

## Silkscreen, mask and mechanical layers (free items; w line width, h text height)
Top Overlay:
  circle w10: c6205,4870 r78.74
  circle w10: c6165,2170 r78.74
  circle w10: c1070,2370 r78.74
  lines w10: 2637.8,1909.45 ccw(c2795.28,1909.45) 2795.28,1751.97 5078.74,1751.97 ccw(c5078.74,1909.45) 5236.22,1909.45 5236.22,3208.66 ccw(c5078.74,3208.66) 5078.74,3366.14 2795.28,3366.14 ccw(c2795.28,3208.66) 2637.8,3208.66 2637.8,1909.45
  text "B1" at 1830,5115 h39.37 r90
  text "B2" at 1935,5115 h39.37 r90
  text "REF" at 2250,5115 h39.37 r90
  text "B1" at 2450,5115 h39.37 r90
  text "B1" at 2565,5115 h39.37 r90
  text "B2" at 3865,5115 h39.37 r90
  text "B2" at 3980,5115 h39.37 r90
  text "GND" at 2161.32,5110.17 h39.37 r90
  text "MIN" at 5585,5070 h39.37
  text "MAX" at 5890,5070 h39.37
  text "W" at 4535,4930 h39.37 r90
  text "W" at 3125,4925 h39.37 r90
  text "o" at 1825,4905 h39.37 r90
  text "o" at 1930,4905 h39.37 r90
  text "of" at 2460,4905 h39.37 r90
  text "o" at 2570,4905 h39.37 r90
  text "AMP1-R" at 2810,4905 h39.37 r90
  text "o" at 3865,4905 h39.37 r90
  text "of" at 3970,4905 h39.37 r90
  text "AMP2-R" at 4205,4895 h39.37 r90
  text "CW" at 4435,4890.64 h39.37 r90
  text "CW" at 3025,4885 h39.37 r90
  text "CCW" at 4320,4851.29 h39.37 r90
  text "CCW" at 2910,4845 h39.37 r90
  text "V5" at 6145,4655 h39.37 r90
  text "V3.3" at 6325,4635 h39.37 r90
  text "ADS_POW" at 6090,4431.56 h39.37
  text "IN" at 5295,4130 h39.37 r90
  text "GND" at 2985,4075 h39.37 r90
  text "BASE" at 2875,4070 h39.37 r90
  text "AMP1" at 3085,4062.55 h39.37 r90
  text "AMP1" at 4440,4062.55 h39.37 r90
  text "AMP2" at 4541.84,4062.55 h39.37 r90
  text "ADS" at 5295,4000 h39.37 r90
  text "ADDED" at 2585,3880 h39.37
  text "o" at 3080,3865 h39.37 r90
  text "of" at 4435,3865 h39.37 r90
  text "o" at 4536.32,3865 h39.37 r90
  text "PT" at 1775,3780 h39.37
  text "of" at 1905,3705 h39.37
  text "o" at 2040,3705 h39.37 r90
  text "V5" at 650,3370 h39.37
  text "SIG-ADDR2" at 4875,3085 h39.37
  text "PT-ADDR4" at 4898.21,2985 h39.37
  text "GND" at 373.5,2928.05 h39.37
  text "PT-ADDR3" at 4898.21,2895 h39.37
  text "PT-ADDR2" at 4898.21,2795 h39.37
  text "V-PT" at 930,2725 h39.37
  text "GND" at 1335,2725 h39.37
  text "PT-ADDR1" at 4911.33,2695 h39.37
  text "SDA" at 6935,2695 h39.37
  text "CS" at 5379.36,2590 h39.37
  text "SCL" at 6935,2585 h39.37
  text "D_OUT" at 5261.29,2496.56 h39.37
  text "D_CLK" at 5261.29,2391.56 h39.37
  text "GND" at 378.5,2373.05 h39.37
  text "SIG-ADDR1" at 4863.53,2305 h39.37
  text "SIG-ADDR0" at 4850.42,2195 h39.37
  text "GND" at 6945,2185 h39.37
  text "V-PT" at 620,2175 h39.37
  text "3.3V" at 6945,2090 h39.37
  text "VIN" at 6945,1995 h39.37
  text "GND" at 1070,1975 h39.37 r90
  text "GND" at 1455,1975 h39.37 r90
  text "VCC5" at 870,1970 h39.37 r90
  text "VCC3.3" at 975,1970 h39.37 r90
  text "VCC5" at 1250,1970 h39.37 r90
  text "VCC3.3" at 1360,1970 h39.37 r90
  text "5V" at 6945,1885 h39.37
Bottom Overlay:
  circle w10: c6205,4870 r78.74
  circle w10: c6165,2170 r78.74
  circle w10: c1070,2370 r78.74
  region: 3759.84,2788.19 3775.59,2788.19 3775.59,2772.44 3759.84,2772.44
  region: 3783.46,2788.19 3799.21,2788.19 3799.21,2772.44 3783.46,2772.44
  region: 3759.84,2764.57 3775.59,2764.57 3775.59,2748.82 3759.84,2748.82
  region: 3783.46,2764.57 3799.21,2764.57 3799.21,2748.82 3783.46,2748.82
  region: 3783.46,2345.28 3799.21,2345.28 3799.21,2329.53 3783.46,2329.53
  region: 3759.84,2345.28 3775.59,2345.28 3775.59,2329.53 3759.84,2329.53
  region: 3783.46,2368.9 3799.21,2368.9 3799.21,2353.15 3783.46,2353.15
  region: 3759.84,2368.9 3775.59,2368.9 3775.59,2353.15 3759.84,2353.15
  region: 4074.8,2368.9 4090.55,2368.9 4090.55,2353.15 4074.8,2353.15
  region: 4098.43,2368.9 4114.17,2368.9 4114.17,2353.15 4098.43,2353.15
  region: 4074.8,2345.28 4090.55,2345.28 4090.55,2329.53 4074.8,2329.53
  region: 4098.43,2345.28 4114.17,2345.28 4114.17,2329.53 4098.43,2329.53
  region: 4074.8,2788.19 4090.55,2788.19 4090.55,2772.44 4074.8,2772.44
  region: 4098.43,2788.19 4114.17,2788.19 4114.17,2772.44 4098.43,2772.44
  region: 4074.8,2764.57 4090.55,2764.57 4090.55,2748.82 4074.8,2748.82
  region: 4098.43,2764.57 4114.17,2764.57 4114.17,2748.82 4098.43,2748.82
  lines w3.94: 3759.84,2310.24 3799.21,2309.84 ; 3759.84,2807.87 3799.21,2807.87 ; 3779.53,2290.35 3779.53,2329.72 ; 3779.53,2788.19 3779.53,2827.56 ; 4074.8,2310.24 4114.17,2309.84 ; 4074.8,2807.87 4114.17,2807.87 ; 4094.49,2290.35 4094.49,2329.72 ; 4094.49,2788.19 4094.49,2827.56
  lines w10: 3602.36,2204.72 4271.65,2204.72 4271.65,2913.39 3602.36,2913.39 3602.36,2204.72
Mechanical 1:
  circle w10: c470,5050 r62.99
  circle w10: c7090,5050 r62.99
  circle w10: c470,1929.13 r62.99
  circle w10: c7090,1906.26 r62.99
  circle w10: c2795.28,3208.66 r59.06
  circle w10: c5078.74,3208.66 r59.06
  circle w10: c5078.74,1909.45 r59.06
  circle w10: c2795.28,1909.45 r59.06
  lines w7.87: 236.22,5353.78 236.22,5236.22 236.22,1771.65 7401.57,1771.65 ; 236.77,5354.33 300,5354.33 7401.57,5354.33
  lines w10: 7401.57,1771.65 7401.57,5354.33